# Altium PCB EVSE_Monitor.PcbDoc (part 2 of 2)
Units mm, origin at the board's own origin, x right, y up, seen from the top; angles counter-clockwise.
Board outline 130 x 100 mm, 2 copper layers (Top Layer, Bottom Layer), stack 1.581 mm thick; 132 components, 83 nets, 447 pads, 252 vias.
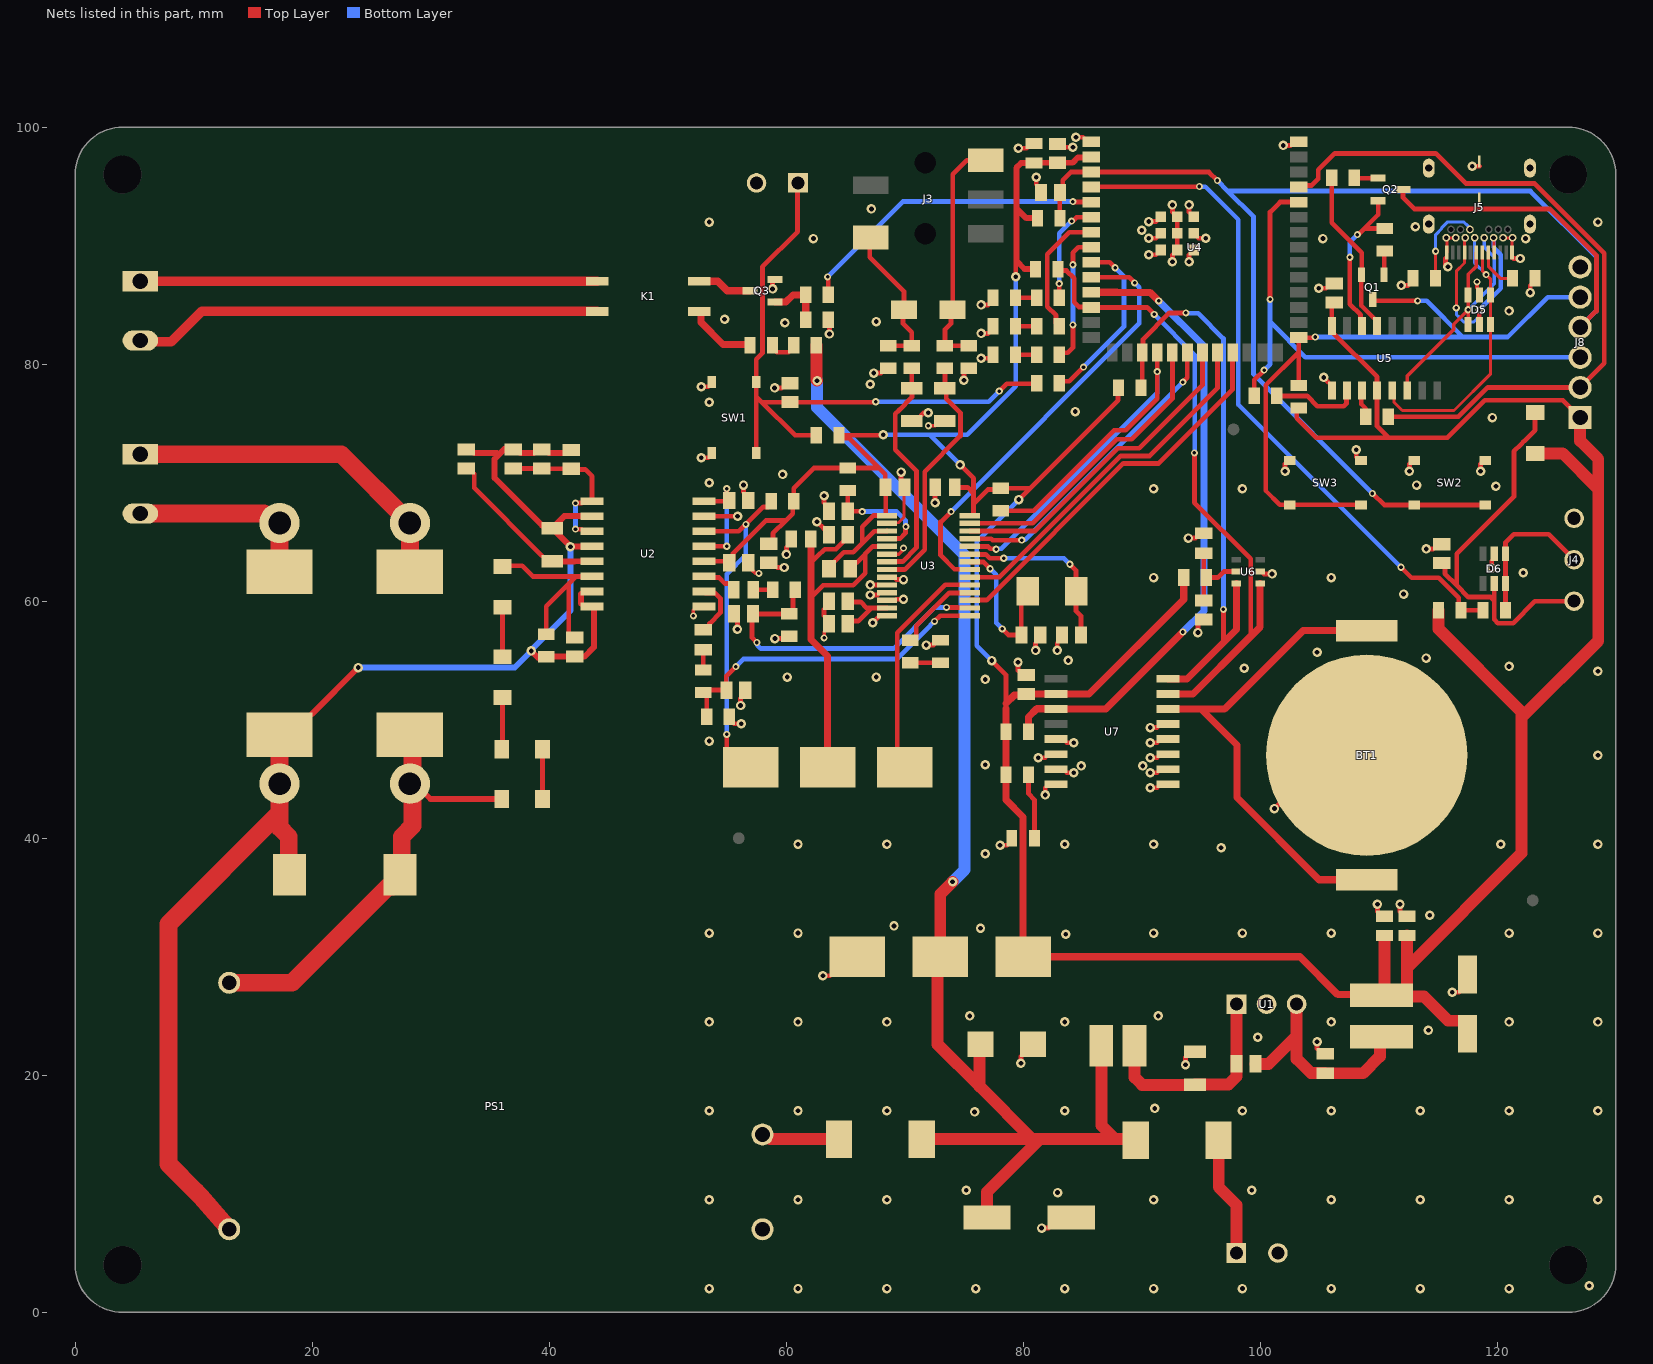
[diagram p2: the nets of this part, all layers, seen from the top]

## Via types
v1: diameter 0.8, hole 0.4, Top Layer to Bottom Layer, tented both sides, 193 vias
v2: diameter 0.6, hole 0.3, Top Layer to Bottom Layer, tented both sides, 59 vias

## Nets (pads, with @x,y where several pads share a name; then routed paths per layer and width w, separated by ;. In a path a pad name is that pad's centre, name@x,y a point inside that pad or via, vN(x,y) a via of type N, cw(c..) or ccw(c..) an arc to the next point about the centre after c; other vN are vias at no path point)
+3V3: C3.1 C4.1 C5.1 C14.1 C15.1 C24.1 C25.1 C33.2 C34.2 C35.2 C39.2 FB1.1 J8.1 L2.2 R1.1 R7.1 R16.1 R18.1 R21.2 R22.2 R27.2 R32.2 R33.2 R34.1 R35.2 R37.1 R38.1 TP3.1 U2.12 U3.1 U3.3 U3.28 U4.2 U5.4 U5.16 U7.2 | length 341.6
  Top Layer w0.4: U2.12@53.075,63.365 C14.1@55.085,63.365 ; C14.1@55.2,63.25 55.51,63.56 55.51,64.02 58.292,66.802 59.964,66.802 ; C15.1@58.547,64.846 58.573,64.846 58.883,65.156 58.883,65.722 59.964,66.802 ; FB1.1@63.728,63 64.853,64.125 65.649,64.125 66.421,64.897 ; v1(68.199,74.041) 68.158,74 R27.2@64.45,74 64.676,73.774 65.291,73.774 67.815,71.25 ; U3.3@68.502,65.925 68.477,65.9 67.424,65.9 66.421,64.897 ; U3.1@68.502,67.225 U3.1@68.425,67.225 ; C24.1@74.23,69.6 75.307,69.6 75.819,69.088 ; v1(74.676,71.501) 75.819,70.358 75.819,69.088 ; U3.28@75.498,67.225 75.794,67.225 75.819,67.25 75.819,68.207 ; v1(77.343,54.991) 78.55,53.784 78.55,51.372 78.55,50.927 ; v1(79.375,87.376) 79.375,89.869 79.422,89.916 ; v1(79.629,68.58) 80.579,69.53 ; R33.2@88.05,78 88.011,77.961 88.011,76.962 80.579,69.53 ; R21.2@103.25,76.3 103.077,76.127 103.077,75.459 104.749,73.787 110.842,73.787 ; U5.16@106.045,83.578 106.045,84.995 C35.2@106.25,85.2 ; U5.16@106.055,83.212 106.18,83.087 106.18,82.62 109.865,78.935 U5.4@109.865,77.788 109.865,74.764 110.842,73.787 ; J8.1@127,75.5 125.55,76.95 118.967,76.95 115.804,73.787 110.842,73.787 ; 59.964,66.802 60.549,67.387 60.549,68.362 R7.1@60.64,68.453 60.64,69.53 62.357,71.247 62.992,71.247 62.995,71.25 R16.1@65.2,71.25 67.815,71.25 ; 66.421,64.897 66.421,66.294 67.352,67.225 U3.1@68.425,67.225 ; 67.815,71.25 68.364,70.701 68.364,69.636 C25.1@68.4,69.6 68.4,67.25 U3.1@68.425,67.225 ; 75.819,68.207 75.819,69.088 ; 75.819,68.207 77.039,69.428 78.003,69.428 R18.1@78.105,69.53 80.579,69.53
  Top Layer w0.5: C33.2@80.9,96.98 80.884,96.964 79.819,96.964 79.422,96.567 79.422,93.171 ; C33.2@80.92,97 C34.2@82.9,97 84.173,97 84.634,97.461 85.721,97.461 U4.2@85.75,97.49 ; R32.2@81.05,88 81.02,88.03 80.118,88.03 79.422,88.726 79.422,89.916 79.422,93.171 ; R22.2@81.219,92.329 80.264,92.329 79.422,93.171
  Top Layer w0.6: 78.55,50.927 R34.1@78.55,49 78.552,48.998 R1.1@78.552,45.339 78.552,43.241 80,41.793 TP3.1@80,30 103.35,30 106.553,26.797 110.203,26.797 L2.2@110.352,26.648 ; 78.55,51.372 79.248,52.07 C39.2@80.391,52.07 ; C39.2@80.28,52.175 U7.2@82.775,52.175 ; U7.2@82.775,52.159 85.56,52.159 93.55,60.149 R38.1@93.55,62
  Top Layer w1: L2.2@110.25,26.75 110.498,26.998 C4.1@110.498,31.75 ; L2.2@110.352,26.648 113.814,26.648 115.862,24.6 117.2,24.6 117.5,24.3 C3.1@117.5,23.5 ; L2.2@112.4,27.3 112.4,29.088 ; C5.1@112.4,31.78 112.4,29.088 ; R35.2@115.05,59.25 115.05,57.67 122.047,50.673 122.047,50.165 ; R37.1@123.2,72.475 125.518,72.475 128.524,69.469 ; J8.1@127,75.5 127,73.533 128.524,72.009 128.524,69.469 ; 112.4,29.088 122.047,38.735 122.047,50.165 ; 122.047,50.165 128.524,56.642 128.524,69.469
  Bottom Layer w0.4: v1(68.199,74.041) 72.136,74.041 ; v1(74.676,71.501) 72.136,74.041 ; v1(77.343,54.991) 76.073,56.261 76.073,65.024 v1(79.629,68.58) ; v1(79.375,87.376) 79.375,78.131 75.285,74.041 72.136,74.041
+3V3A: C8.1 C28.1 FB1.2 TP4.1 U3.5 | length 35.4
  Top Layer w0.4: 62.103,60.325 63.119,61.341 65.659,61.341 66.675,62.357 66.675,63.881 ; 62.127,62.8 62.127,63.27 62.641,63.784 63.246,64.389 64.2,64.389 64.876,65.065 64.89,65.065 65.2,65.375 C28.1@65.2,65.6 ; FB1.2@65.416,62.738 65.416,62.888 65.791,63.263 65.941,63.263 67.303,64.625 U3.5@68.502,64.625 U3.5@68.477,64.6
  Top Layer w0.6: C8.1@62.08,65.25 62.103,65.227 62.103,63.27 62.103,62.776 62.103,60.325 62.103,56.769 63.5,55.372 TP4.1@63.5,46
+VIN: C2.1 D1.1 D2.1 D3.1 L1.1 R41.2 TP2.1 | length 115
  Top Layer w1: R41.2@62.55,81.6 62.55,78.674 v1(62.611,78.613) ; D1.1@71.445,14.605 80.772,14.605 ; v1(74.041,36.322) 73,35.281 TP2.1@73,30 72.771,29.771 72.771,22.606 76.327,19.05 ; D3.1@76.413,22.606 76.327,22.52 76.327,19.05 ; C2.1@76.95,8 76.95,10.148 81.407,14.605 ; L1.1@86.6,22.5 86.6,15.762 87.63,14.732 ; D2.1@89.268,14.732 D2.1@89.395,14.605 ; D2.1@89.5,14.5 D2.1@89.395,14.605 ; 76.327,19.05 80.772,14.605 ; 80.772,14.605 81.407,14.605 ; 81.407,14.605 D2.1@89.395,14.605
  Bottom Layer w1: v1(62.611,78.613) 62.611,76.327 75.057,63.881 75.057,37.338 v1(74.041,36.322)
AC_L1: F1.1 F1B.1 J1.1 | length 29.3
  Top Layer w1.5: J1.1@5.5,72.4 22.45,72.4 F1B.1@28.25,66.6 F1.1@28.25,62.475
AC_L1_F: F1.2 F1B.2 PS1.4 R2.1 RV1.1 | length 38.6
  Top Layer w0.5: F1B.2@28.7,44.6 29.993,43.307 R2.1@35.994,43.307
  Top Layer w1.5: PS1.4@13,27.8 18.3,27.8 26.4,35.9 26.75,35.9 27.4,36.55 RV1.1@27.4,36.9 27.559,37.059 27.559,40.132 28.475,41.048 28.475,48.5 F1.2@28.25,48.725
AC_L2: F2.1 F2B.1 J1.2 | length 16.2
  Top Layer w1.5: J1.2@5.5,67.4 15.936,67.4 16.736,66.6 F2B.1@17.25,66.6 F2.1@17.25,62.475
AC_L2_F: C9.2 C10.2 C11.2 C12.2 C16.2 C17.2 F2.2 F2B.2 PS1.1 R6.2 RV1.2 U2.2 U2.4 U2.7 U2.8 | length 113.9
  Top Layer w0.5: F2.2@20,50.5 v1(23.9,54.4) ; C17.2@33.7,72.5 35.6,72.5 ; C11.2@36.3,72.9 35.4,72 35.4,70.4 C16.2@39.4,66.4 ; C11.2@37.6,72.5 C10.2@38.7,72.5 ; v1(38.5,55.8) R6.2@39.1,55.2 ; C10.2@40,72.5 C12.2@41.2,72.5 ; R6.2@40.155,55.334 C9.2@42.164,55.334 C9.2@42.291,55.334 ; U2.8@42.7,59.8 U2.7@42.7,60.6 ; C9.2@42.776,55.372 42.253,55.372 C9.2@42.291,55.334 ; U2.8@43.625,59.555 U2.8@43.7,59.48 ; U2.4@43.625,64.635 41.784,64.635 C16.2@40.259,66.16 41.274,67.175 U2.2@43.625,67.175 ; U2.8@43.776,59.48 43.776,56.113 42.997,55.334 C9.2@42.291,55.334
  Top Layer w1.5: PS1.1@13,7 cw(c14.128,7.989) 12.999,7.002 10.592,9.754 ccw(c4,4) 10.187,10.187 7.874,12.5 7.874,12.728 7.874,32.766 17.25,42.142 ; F2.2@17.25,48.725 F2B.2@17.25,44.6 17.25,42.142 ; RV1.2@18.1,36.9 18.034,36.966 18.034,40.132 17.25,40.916 17.25,42.142
  Bottom Layer w0.5: v1(23.9,54.4) 37.1,54.4 v1(38.5,55.8) ; v1@38.7,56.1 41.8,59.2 v1(41.8,64.6)
AHT_VDD: C37.2 C38.2 R38.2 U6.2 | length 6.6
  Top Layer w0.4: C38.2@95.25,60.05 R38.2@95.25,62 ; R38.2@95.25,62.152 C37.2@95.25,64.067 ; R38.2@95.45,62 96.417,62 96.917,62.5 U6.2@98,62.5
AMC_DIAG: R7.2 TP5.1 U2.14 | length 29.1
  Top Layer w0.4: U2.14@53.075,65.905 53.086,65.894 54.413,65.894 56.005,65.894 58.064,67.953 58.465,67.953 58.74,68.228 R7.2@58.74,68.453 ; v2(54.991,48.768) 54.991,47.515 56.506,46 TP5.1@57,46
  Bottom Layer w0.4: v2(54.991,48.768) 54.991,62.291 56.6,63.9 v2(56.6,66.489)
AMC_LDO: C13.1 U2.13 U2.16 | length 10
  Top Layer w0.4: U2.13@53.075,64.635 v2(54.99,64.635) ; U2.16@53.075,68.445 55.145,68.445 C13.1@55.2,68.5 ; C13.1@54.99,68.445 v2(54.99,69.5)
  Bottom Layer w0.4: v2(54.99,64.635) v2(54.99,69.5)
AMC_OUTN: C21.1 U2.10 | length 5
  Top Layer w0.4: C21.1@53,57.58 53.25,57.58 53.535,57.865 53.535,58.115 54.45,59.03 54.45,60.231 53.981,60.7 53.2,60.7 U2.10@53.075,60.825
AMC_OUTP: C18.1 U2.11 | length 2.9
  Top Layer w0.4: U2.11@53.075,62.095 53.168,62.002 54.33,62.002 54.837,61.495 55.273,61.495 55.436,61.332 C18.1@55.436,61.125
ATM_CF1: R17.1 U3.18 | length 7.2
  Top Layer w0.4: R17.1@70.485,56.703 70.71,56.703 70.985,56.978 70.985,57.917 73.768,60.7 75.473,60.7 U3.18@75.498,60.725
ATM_CF2: TP6.1 U3.19 | length 19.4
  Top Layer w0.4: TP6.1@70,46 69.385,46.615 69.385,57.344 73.441,61.4 75.473,61.4 U3.19@75.498,61.375
ATM_IN: C23.1 R15.2 U3.8 | length 21
  Top Layer w0.4: U3.8@68.502,62.675 70.001,62.675 71.685,64.359 71.685,70.923 74.71,73.948 74.71,75.901 74.543,76.067 73.511,77.099 73.511,77.879 C23.1@73.4,77.99 R15.2@73.4,79.65
ATM_IP: C20.1 R8.2 U3.7 | length 19.4
  Top Layer w0.4: U3.7@68.502,63.325 68.527,63.35 69.827,63.35 70.993,64.516 70.993,70.993 69.215,72.771 69.215,75.826 69.524,76.135 69.531,76.135 70.612,77.216 70.612,77.978 C20.1@70.6,77.99 R8.2@70.6,79.65
ATM_RST: C29.1 R16.2 U3.4 | length 9.8
  Top Layer w0.4: R16.2@65.2,69.35 C29.1@65.2,67.6 66.385,67.6 v2(66.421,67.564) ; U3.4@68.502,65.275 68.52,65.293 69.611,65.293 70.066,65.748 70.066,66.256 v2(70.104,66.294)
  Bottom Layer w0.4: v2(66.421,67.564) 69.342,67.564 70.066,66.84 70.066,66.332 v2(70.104,66.294)
ATM_VN: C22.1 R12.2 R14.1 U3.15 | length 28.1
  Top Layer w0.4: R14.1@53.3,50.25 53.3,52.025 53.025,52.3 R12.2@53,52.3 53.2,52.5 C22.1@54.95,52.5 54.95,53.68 v2(55.753,54.483) ; v2(72.517,58.293) 72.999,58.775 U3.15@75.498,58.775
  Bottom Layer w0.4: v2(55.753,54.483) 56.388,55.118 69.342,55.118 72.163,57.939 72.163,57.959 72.497,58.293 v2(72.517,58.293)
ATM_VP: C19.1 R9.2 R10.1 U3.16 | length 27.7
  Top Layer w0.4: C19.1@57.188,58.928 C19.1@57.596,58.928 ; v2(57.531,56.515) 57.122,56.924 57.122,58.454 C19.1@57.596,58.928 ; R10.1@60.228,58.928 59.436,58.928 C19.1@57.596,58.928 ; R10.1@60.381,58.95 60.579,59.148 60.579,60.772 R9.2@60.767,60.96 ; v2(73.533,59.475) 74.455,59.475 74.48,59.45 75.473,59.45 U3.16@75.498,59.425
  Bottom Layer w0.4: v2(57.531,56.515) 57.569,56.477 57.569,56.303 57.865,56.007 69.088,56.007 72.556,59.475 v2(73.533,59.475)
ATM_VREF: C30.1 C31.1 U3.13 | length 6.1
  Top Layer w0.4: C31.1@65.2,58.1 65.429,58.329 66.076,58.329 67.172,59.425 ; C30.1@65.2,60 65.256,59.944 66.294,59.944 66.813,59.425 67.172,59.425 ; U3.13@68.502,59.425 67.172,59.425
BTN_PARAR: R31.2 U4.9 | length 14.9
  Top Layer w0.4: R31.2@83.05,78.4 83.207,78.557 83.891,78.557 v2(85.09,79.756) ; U4.9@85.75,88.6 87.295,88.6 v2(87.757,88.138)
  Bottom Layer w0.4: v2(85.09,79.756) 88.519,83.185 88.519,87.376 v2(87.757,88.138)
CC1: J5.A5 R23.2 | length 3.6
  Top Layer w0.25: J5.A5@119.25,89.42 119.253,89.417 119.253,88.265 120.268,87.25 R23.2@121.3,87.25
CC2: J5.B5 R24.2 | length 7.4
  Top Layer w0.25: R24.2@114.808,87.254 v2(114.808,89.535)
  Bottom Layer w0.25: v2(114.808,89.535) 114.808,90.931 115.319,91.443 115.319,91.509 115.831,92.02 117.169,92.02 117.55,91.639 117.55,91.628 117.7,91.478 J5.B5@117.7,91.37
CH_RXD: R25.2 U5.3 | length 2.4
  Top Layer w0.381: U5.3@108.595,77.788 108.55,77.743 108.55,76.616 108.905,76.261 R25.2@108.905,75.565
CH_TXD: R26.1 U5.2 | length 7.5
  Top Layer w0.4: R26.1@101.407,77.325 103.966,77.325 104.837,76.454 107.054,76.454 107.289,76.688 107.289,77.752 U5.2@107.325,77.788
CT_N: D4.1 J3.1 R13.1 R15.1 | length 20
  Top Layer w0.4: R13.1@75.4,81.55 R15.1@73.4,81.55 73.4,82.925 73.914,83.439 73.914,84.464 D4.1@74.05,84.6 74.05,96.021 75.229,97.2 J3.1@76.85,97.2
CT_P: D4.2 J3.2 R8.1 R11.2 | length 12.7
  Top Layer w0.4: J3.2@67.15,90.7 67.056,90.606 67.056,89.027 69.95,86.133 D4.2@69.95,84.6 69.85,84.5 69.85,83.439 70.6,82.689 R8.1@70.6,81.55 R11.2@68.6,81.55
DTR_N: Q1.2 R19.1 U5.13 | length 14.2
  Top Layer w0.381: R19.1@106.05,95.75 106.05,91.943 108.585,89.408 108.585,87.59 Q1.2@108.545,87.55 108.545,84.928 109.689,83.784 109.73,83.784 109.865,83.649 U5.13@109.865,83.212
ESP_EN: C32.2 J8.4 Q2.3 R22.1 SW2.C1 SW2.D1 U4.3 | length 124.3
  Top Layer w0.4: R22.1@82.992,92.329 83.096,92.433 C32.2@83.096,94.488 83.343,94.735 83.343,95.535 84.028,96.22 U4.3@85.75,96.22 95.677,96.22 v2(96.393,95.504) ; v2(109.474,69.088) 109.507,69.088 110.47,68.125 SW2.C1@113,68.125 SW2.D1@119,68.125 ; Q2.3@112.05,94.75 112.05,94.071 113.03,93.091 124.46,93.091 128.375,89.176 128.375,84.495 J8.4@127,83.12
  Bottom Layer w0.4: v2(96.393,95.504) 97.282,94.615 ; v2@109.474,69.114 99.441,79.147 99.441,92.456 97.282,94.615 ; J8.4@127,83.12 128.375,84.495 128.375,89.049 122.809,94.615 97.282,94.615
ESP_IO0: J8.5 Q1.3 R21.1 SW3.C1 SW3.D1 U4.27 | length 59.5
  Top Layer w0.381: R21.1@103.25,78.2 103.25,81.013 ; v2(104.648,82.296) 104.589,82.296 104.543,82.25 U4.27@103.25,82.25 103.25,81.013 ; SW3.D1@108.5,68.125 SW3.C1@102.5,68.125 102.478,68.147 101.652,68.147 100.457,69.342 100.457,78.22 103.25,81.013 ; Q1.3@109.5,85.45 109.606,85.344 v2(113.284,85.344)
  Bottom Layer w0.381: v2(104.648,82.296) 117.094,82.296 ; v2(113.284,85.344) 114.046,85.344 117.094,82.296 ; J8.5@127,85.66 124.268,85.66 120.904,82.296 117.094,82.296
EVSE_EN_A: J2.2 K1.4 | length 39.6
  Top Layer w0.8: J2.2@5.5,82 5.585,81.915 8.128,81.915 10.673,84.46 K1.4@44.05,84.46
EVSE_EN_B: J2.1 K1.3 | length 38.6
  Top Layer w0.8: J2.1@5.5,87 K1.3@44.05,87
GND: BT1.3 C2.2 C3.2 C4.2 C5.2 C6.2 C7.2 C8.2 C13.2 C14.2 C15.2 C19.2 C20.2 C22.2 C23.2 C24.2 C25.2 C26.2 C27.2 C28.2 C29.2 C30.2 C31.2 C32.1 C33.1 C34.1 C35.1 C36.1 C37.1 C38.1 C39.1 C40.1 D3.2 D5.2 D6.2 J4.3 J5.A1 J5.A12 J5.B1 J5.B12 J5.Shell J6.2 J7.2 J8.6 LED1.1 LED2.1 LED3.1 LED4.1 LED5.1 PS1.2 Q3.2 R10.2 R11.1 R13.2 R14.2 R23.1 R24.1 R40.1 SW1.A1 SW1.B1 SW2.A1 SW2.B1 SW3.A1 SW3.B1 TP1.1 U1.2 U2.9 U2.15 U3.2 U3.6 U3.9 U3.10 U3.11 U3.12 U3.14 U4.1 U4.40 U4.41 U4.42 U4.43 U4.44 U4.45 U4.46 U4.47 U4.48 U4.49 U5.1 U6.5 U7.5 U7.6 U7.7 U7.8 U7.9 U7.10 U7.11 U7.12 U7.13 | length 64.5
  Top Layer w0.25: U3.2@69,66.62 69.49,66.62 69.95,67.08 C25.2@69.95,69 ; J5.B1@115.7,90.67 J5.Shell@116.5,90.67 ; J5.A12@115.75,89.42 J5.B1@115.75,90.4 ; J5.Shell@120.5,90.67 J5.B12@121.3,90.67 ; J5.A1@121.25,89.42 J5.B12@121.25,90.4
  Top Layer w0.3: v2(52.175,58.755) U2.9@52.175,59.255 ; C14.2@57.2,62.55 57.4,62.35 v2(57.7,62.35) ; v2(63.2,56.9) C31.2@63.2,57.4 ; U3.6@69.302,63.975 69.502,63.975 69.902,64.375 v2(69.902,64.475) ; v2(72,74.81) C23.2@72.6,74.81 ; D5.2@118.3,86.45 v2(118.3,86.95)
  Top Layer w0.4: v1(52.825,72.1) SW1.A1@53.425,72.1 ; v1(52.825,78.1) SW1.B1@53.425,78.1 ; U2.15@53.075,67.175 v1(55.9,67.175) ; R14.2@55.6,49.65 v1(56.2,49.65) ; v1(55.888,57.628) C19.2@55.888,58.228 ; v1(56.15,51.2) C22.2@56.15,51.8 ; C13.2@56.4,69.2 v1(56.4,69.8) ; v1(58.85,86.355) Q3.2@58.85,86.955 ; v1(59.025,77.997) C36.1@59.625,77.997 ; v1(59.05,56.85) R10.2@59.65,56.85 ; C15.2@59.247,62.846 v1(59.847,62.846) ; v1(60.02,63.95) C8.2@60.02,64.55 ; v1(62.6,66.7) C28.2@63.2,66.1 ; v1(63.1,28.4) TP1.1@63.7,28.4 ; C31.2@63.2,58.8 C30.2@63.2,59.3 ; C29.2@63.2,68.3 v1(63.2,68.9) ; v1(63.65,82.55) R40.1@63.65,83.15 ; v1(67.102,60.525) U3.11@67.702,60.525 ; v1(67.102,61.375) U3.10@67.702,61.375 ; v1(67.302,58.175) U3.14@67.702,58.575 ; v1(67.4,79.25) R11.1@68,79.25 ; U3.12@69.302,60.175 v1(69.902,60.175) ; U3.9@69.302,61.825 v1(69.902,61.825) ; C25.2@69.7,70.3 v1(69.7,70.9) ; C20.2@71.4,75.71 71.6,75.91 v1(72,75.91) ; v1(71.825,56.303) LED2.1@72.425,56.303 ; v1(72.57,68.3) C24.2@72.57,68.9 ; v1(75,78.65) R13.2@75,79.25 ; v1(76.45,80.5) LED5.1@77.05,80.5 ; v1(76.45,82.6) LED4.1@77.05,82.6 ; v1(76.45,85) LED3.1@77.05,85 ; v1(78.05,39.4) LED1.1@78.65,39.4 ; C39.1@79.564,54.159 v1(79.564,54.859) ; v1(79.6,98.22) C33.1@80.3,98.22 ; v1(79.813,21.006) D3.2@79.813,21.606 ; v1(81.045,55.85) C26.2@81.045,56.45 ; C32.1@81.096,95.188 v1(81.096,95.788) ; v1(81.275,46.795) U7.6@81.875,46.795 ; v1(81.55,7.1) C2.2@82.15,7.1 ; v1(81.875,43.655) U7.8@81.875,44.255 ; v1(82.874,55.85) C27.2@82.874,56.45 ; C34.1@83.6,98.3 v1(84.2,98.3) ; U7.7@83.675,45.525 v1(84.275,45.525) ; U7.5@83.675,48.065 v1(84.275,48.065) ; v1(84.45,99.16) U4.1@85.05,99.16 ; v1(90.6,89.24) U4.44@91.2,89.24 ; v1(90.6,90.64) U4.43@91.2,90.64 ; v1(90.6,92.04) U4.42@91.2,92.04 ; v1(90.725,44.255) U7.9@91.325,44.255 ; v1(90.725,45.525) U7.10@91.325,45.525 ; v1(90.725,46.795) U7.11@91.325,46.795 ; v1(90.725,48.065) U7.12@91.325,48.065 ; v1(90.725,49.335) U7.13@91.325,49.335 ; v1(92.6,88.64) U4.45@92.6,89.24 ; U4.49@92.6,92.84 v1(92.6,93.44) ; U4.45@93,89.64 U4.41@93,91.04 U4.49@93,92.44 ; v1(93.7,20.89) C6.2@93.7,21.49 ; v1(93.95,65.327) C37.1@94.55,65.327 ; v1(94,88.64) U4.46@94,89.24 ; U4.48@94,92.84 v1(94,93.44) ; v1(94.75,57.35) C38.1@94.75,58.05 ; U4.47@94.8,90.64 v1(95.4,90.64) ; U6.5@100.3,62.3 v1(101,62.3) ; v1(101.2,42.5) BT1.3@101.6,42.9 ; v1(101.95,98.46) U4.40@102.55,98.46 ; v1(102.1,70.975) SW3.A1@102.1,71.575 ; C7.2@104.8,22.23 v1(104.8,22.83) ; v1(104.95,86.4) C35.1@105.55,86.4 ; v1(105.355,78.888) U5.1@105.755,78.488 ; SW3.B1@108.1,72.175 v1(108.1,72.775) ; C4.2@109.9,33.82 v1(109.9,34.42) ; C5.2@111.8,33.82 v1(111.8,34.42) ; v1(111.903,86.649) R24.1@112.503,86.649 ; v1(112.6,70.975) SW2.A1@112.6,71.575 ; v1(114.016,64.408) C40.1@114.616,64.408 ; J5.A12@115.65,88.92 115.65,88.42 v1(115.85,88.22) ; v1(116.2,27) C3.2@116.8,27 ; v1(117.9,96.7) J5.Shell@118.5,96.7 ; v1(118.6,70.975) SW2.B1@118.6,71.575 ; v1(119.55,62.8) D6.2@119.55,63.4 ; J5.A1@121.35,88.92 v1(121.95,88.92) ; v1(122.8,86.05) R23.1@122.8,86.65
  other v1: 53.5,2 61,2 68.5,2 76,2 83.5,2 91,2 98.5,2 106,2 113.5,2 121,2 127.768,2.232 53.5,9.5 61,9.5 68.5,9.5 91,9.5 106,9.5 113.5,9.5 121,9.5 128.5,9.5 82.9,10.1 75.2,10.3 99.3,10.3 75.9,16.9 53.5,17 61,17 68.5,17 83.5,17 98.5,17 106,17 113.5,17 121,17 128.5,17 91.1,17.2 99.8,23.2 114.2,23.8 53.5,24.5 61,24.5 68.5,24.5 83.5,24.5 106,24.5 121,24.5 128.5,24.5 75.5,25 91.4,25 83.6,31.9 53.5,32 61,32 91,32 98.5,32 106,32 121,32 128.5,32 76.4,32.4 69.1,32.6 114.3,33.5 76.8,38.7 96.702,39.185 61,39.5 68.5,39.5 83.5,39.5 91,39.5 120.3,39.5 128.5,39.5 84.9,46.1 90.1,46.1 76.8,46.2 128.5,47 53.5,48.2 76.8,53.4 60.1,53.6 67.6,53.6 128.5,54.1 98.66,54.34 121,54.5 83.8,55 114,55.2 104.8,55.7 112.1,60.6 91,62 106,62 122.2,62.4 91,69.5 98.5,69.5 119.9,69.7 113.2,69.8 53.5,70 59.7,70.7 119.6,75.5 84.4,76 53.5,76.8 67.1,78.3 59.9,83.5 67.6,83.6 54.8,83.8 121,84.5 62.3,90.6 105.3,90.6 122.4,90.6 90,91.3 113.1,91.6 53.5,92 128.5,92 67.2,93.1
HV_D1: R2.2 R3.1 | length 4.2
  Top Layer w0.4: R2.2@39.444,43.307 R3.1@39.444,47.498
HV_D2: R3.2 R4.1 | length 4.5
  Top Layer w0.4: R3.2@35.994,47.498 36.068,47.572 R4.1@36.068,51.869
  Top Layer w1: R4.1@35.994,51.795 R4.1@36.068,51.869
HV_D3: R4.2 R5.1 | length 4.2
  Top Layer w0.4: R4.2@36.068,55.319 R5.1@36.068,59.489
HV_DCDC: C10.1 C11.1 C12.1 U2.1 U2.3 | length 12.2
  Top Layer w0.4: C11.1@36.957,71.209 C10.1@39.37,71.209 39.404,71.175 C12.1@41.857,71.175 41.912,71.12 43.053,71.12 43.625,70.548 U2.1@43.625,68.445 ; v2(42.222,66.08) U2.3@42.722,66.08 ; v2(42.222,68.28) U2.1@42.722,68.28
  Bottom Layer w0.4: v2(42.222,66.08) v2(42.222,68.28)
HV_INP: C9.1 R5.2 R6.1 U2.6 | length 19.5
  Top Layer w0.4: R5.2@36.068,62.939 36.121,62.992 37.719,62.992 38.616,62.095 42.283,62.095 ; R6.1@40.026,56.936 R6.1@39.751,57.211 39.751,59.563 41.656,61.468 ; C9.1@41.91,57.188 C9.1@42.164,56.934 41.966,56.934 41.656,57.244 41.656,61.468 ; U2.6@43.625,62.095 42.283,62.095 ; 41.656,61.468 41.969,61.781 42.283,62.095
HV_LDO: C16.1 C17.1 U2.5 | length 12.6
  Top Layer w0.4: C17.1@33.685,70.755 33.685,69.555 C16.1@39.385,63.855
  Top Layer w0.5: C16.1@40.259,63.365 42.156,63.365 42.164,63.373 43.617,63.373 U2.5@43.625,63.365
I2C_SCL: R33.1 U4.17 U6.3 U7.16 | length 50.4
  Top Layer w0.4: R33.1@89.95,78 90.055,78.105 U4.17@90.055,81 90.117,81.062 90.117,82.116 92.329,84.328 v2(93.726,84.328) ; 96.52,56.134 96.901,56.515 v2(96.901,59.309)
  Top Layer w0.6: U7.16@92.225,53.445 93.831,53.445 96.52,56.134 98,57.614 U6.3@98,61.5
  Bottom Layer w0.4: v2(93.726,84.328) 93.764,84.29 94.78,84.29 96.901,82.169 v2(96.901,59.309)
I2C_SDA: R32.1 U4.12 U6.4 U7.15 | length 55.7
  Top Layer w0.4: R32.1@82.95,88 83.05,87.9 83.657,87.9 84.306,87.252 84.306,85.239 84.709,84.836 85.704,84.836 U4.12@85.75,84.79 90.47,84.79 v2(91.059,84.201) ; v2(94.45,72.517) 94.45,68.313 99.2,63.563 99.2,57.036 98.87,56.706
  Top Layer w0.6: U7.15@92.225,52.175 94.339,52.175 98.87,56.706 100,57.836 U6.4@100,61.5
  Bottom Layer w0.4: v2(91.059,84.201) 94.488,80.772 94.488,72.555 v2(94.45,72.517)
J4_3V3: C40.2 D6.5 J4.1 R37.2 | length 34.2
  Top Layer w0.4: C40.2@115.316,63.208 115.52,63.208 115.595,63.133 115.595,62.332 116.586,61.341 ; D6.5@119.75,61.5 119.75,60.041 ; R37.2@123.2,75.925 123.2,74.432 122.268,73.5 122.259,73.5 122.025,73.266 122.025,73.257 121.412,72.644 121.412,68.834 116.586,64.008 116.586,61.341 ; J4.1@126.5,60 123.191,60 121.341,58.15 120.059,58.15 119.75,58.459 119.75,60.041 ; 116.586,61.341 117.577,60.35 119.441,60.35 119.75,60.041
LED_CARGA: R29.2 U4.7 | length 11
  Top Layer w0.4: R29.2@83.05,83.2 82.775,83.475 82.775,84.134 82.042,84.867 82.042,89.281 83.901,91.14 U4.7@85.75,91.14
LED_FALLA: R30.2 U4.8 | length 11.1
  Top Layer w0.4: R30.2@83.05,80.8 83.213,80.963 83.757,80.963 84.201,81.407 v2(84.201,83.312) ; v2(84.201,88.392) 84.201,89.408 84.663,89.87 U4.8@85.75,89.87
  Bottom Layer w0.4: v2(84.201,83.312) v2(84.201,88.392)
LED_WIFI: R28.2 U4.6 | length 8.7
  Top Layer w0.4: R28.2@83.05,85.6 v2(83.05,86.8) ; v2(84.094,92.075) 84.168,92.075 84.503,92.41 U4.6@85.75,92.41
  Bottom Layer w0.4: v2(83.05,86.8) 83.05,91.051 84.074,92.075 v2(84.094,92.075)
MEAS_CS: R18.2 U3.24 U4.18 | length 44.2
  Top Layer w0.4: U3.24@75.498,64.625 77.026,64.625 77.224,64.427 77.686,64.427 v2(77.724,64.389) ; R18.2@78.105,67.63 80.878,67.63 87.67,74.422 88.646,74.422 91.313,77.089 91.313,80.988 U4.18@91.325,81
  Bottom Layer w0.4: v2(77.724,64.389) 77.757,64.422 78.164,64.422 91.313,77.571 v2(91.313,79.375)
MEAS_IRQ: U3.20 U4.22 | length 30.5
  Top Layer w0.4: U3.20@75.498,62.025 78.001,62.025 88.239,72.263 90.678,72.263 96.394,77.979 96.394,80.989 U4.22@96.405,81
MEAS_MISO: U3.26 U4.21 | length 27.5
  Top Layer w0.4: U3.26@75.498,65.925 80.998,65.925 87.977,72.905 89.796,72.905 95.124,78.233 95.124,80.989 U4.21@95.135,81
MEAS_MOSI: U3.27 U4.19 | length 25.4
  Top Layer w0.4: U3.27@75.498,66.575 80.799,66.575 87.884,73.66 89.154,73.66 92.595,77.101 U4.19@92.595,81
MEAS_SCK: U3.25 U4.20 | length 26.2
  Top Layer w0.4: U3.25@75.498,65.275 77.292,65.275 77.416,65.151 v2(79.883,65.151) ; v2(93.472,78.486) 93.853,78.867 93.853,80.988 U4.20@93.865,81
  Bottom Layer w0.4: v2(79.883,65.151) 79.921,65.189 80.175,65.189 v2(93.472,78.486)
MEAS_WARN: U3.17 U4.23 | length 32.7
  Top Layer w0.4: U3.17@75.498,60.075 75.523,60.1 76.924,60.1 88.452,71.628 91.44,71.628 97.664,77.852 97.664,80.989 U4.23@97.675,81
MEAS_ZX: U3.21 U4.10 | length 36.9
  Top Layer w0.4: v2(73.914,67.564) 73.025,66.675 73.025,63.881 74.206,62.7 75.473,62.7 U3.21@75.498,62.675 ; U4.10@85.75,87.33 88.946,87.33 v2(89.408,86.868)
  Bottom Layer w0.4: v2(73.914,67.564) 89.789,83.439 89.789,86.487 v2(89.408,86.868)
NetC1_1: C1.1 C7.1 L2.1 U1.3 | length 18.9
  Top Layer w1: C1.1@99.606,20.955 100.711,20.955 103.08,23.324 ; U1.3@103.08,26 103.08,23.324 ; L2.1@110.25,23.25 110.109,23.109 110.109,21.59 108.689,20.17 C7.1@105.5,20.17 105.485,20.185 104.951,20.185 104.943,20.193 104.267,20.193 103.08,21.38 103.08,23.324
NetC1_2: C1.2 C6.1 L1.2 U1.1 | length 18.2
  Top Layer w1: L1.2@89.4,22.5 89.4,19.82 90.043,19.177 93.739,19.177 93.747,19.185 94.475,19.185 C6.1@94.5,19.21 97.315,19.21 97.996,19.891 97.996,20.945 C1.2@98.006,20.955 ; C1.2@98.006,20.73 U1.1@98.006,25.994
NetC18_2: C18.2 R9.1 | length 1.6
  Top Layer w0.4: C18.2@57.218,60.96 R9.1@58.867,60.96
NetC21_2: C21.2 R12.1 | length 1.7
  Top Layer w0.4: R12.1@53,54.2 C21.2@53,55.92
NetK1_1: K1.1 LED6.1 | length 6
  Top Layer w0.6: K1.1@52.65,84.46 52.732,84.46 52.807,84.385 52.807,83.536 54.682,81.661 56.889,81.661 LED6.1@56.95,81.6
NetLED1_2: LED1.2 R1.2 | length 5.5
  Top Layer w0.4: R1.2@80.452,45.339 80.452,43.754 80.95,43.256 LED1.2@80.95,40
NetLED2_2: LED2.2 R17.2 | length 2.5
  Top Layer w0.4: R17.2@70.485,54.803 LED2.2@73.025,54.803
NetLED3_2: LED3.2 R28.1 | length 1.8
  Top Layer w0.4: LED3.2@79.35,85.6 R28.1@81.15,85.6
NetLED4_2: LED4.2 R29.1 | length 1.8
  Top Layer w0.4: LED4.2@79.35,83.2 R29.1@81.15,83.2
NetLED5_2: LED5.2 R30.1 | length 1.8
  Top Layer w0.4: LED5.2@79.35,80.8 R30.1@81.15,80.8
NetLED6_2: LED6.2 R41.1 | length 1
  Top Layer w0.4: LED6.2@59.2,81 R41.1@60.2,81
NetQ1_1: Q1.1 R20.2 | length 2
  Top Layer w0.381: Q1.1@110.455,87.55 110.455,89.505 R20.2@110.5,89.55
NetQ2_1: Q2.1 R19.2 | length 2
  Top Layer w0.381: R19.2@107.95,95.75 107.995,95.705 Q2.1@109.95,95.705
NetQ3_1: Q3.1 R39.2 R40.2 | length 5
  Top Layer w0.6: Q3.1@59.05,85.245 59.972,85.245 60.579,85.852 61.648,85.852 R39.2@61.65,85.85 R40.2@61.65,83.75
OW_DATA: R35.1 R36.1 U4.4 | length 57.5
  Top Layer w0.381: U4.4@85.75,94.95 85.796,94.996 v2(94.869,94.996) ; v2(111.887,62.865) 112.776,61.976 115.062,61.976 116.758,60.28 116.758,59.442 R35.1@116.95,59.25 R36.1@118.8,59.25
  Bottom Layer w0.381: v2(94.869,94.996) 95.377,94.996 98.171,92.202 98.171,76.581 v2(111.887,62.865)
OW_J4: D6.1 D6.6 J4.2 R36.2 | length 12.7
  Top Layer w0.4: R36.2@120.7,59.25 D6.6@120.7,61.5 D6.1@120.7,64 120.713,64.013 120.713,64.96 121.412,65.659 124.341,65.659 J4.2@126.5,63.5
PARAR_IN: C36.2 J7.1 R27.1 R31.1 SW1.C1 SW1.D1 | length 54.5
  Top Layer w0.4: SW1.C1@57.475,72.5 57.475,77.272 ; J7.1@61,95.3 60.96,95.26 60.96,91.186 58,88.226 58,80.934 57.475,80.409 SW1.D1@57.475,78.5 57.475,77.272 ; R27.1@62.55,74 60.747,74 57.95,76.797 ; v2(67.564,76.835) 67.526,76.797 C36.2@60.325,76.797 57.95,76.797 ; v2(77.978,77.724) 78.613,78.359 R31.1@81.15,78.359 ; 57.475,77.272 57.95,76.797
  Bottom Layer w0.4: v2(67.564,76.835) 77.089,76.835 v2(77.978,77.724)
RELAY_DRV: K1.2 Q3.3 | length 4.6
  Top Layer w0.6: K1.2@52.65,87 54.224,87 55.024,86.2 Q3.3@56.95,86.2
RELAY_EN: R39.1 U4.5 | length 26.4
  Top Layer w0.4: v2(63.5,87.376) 63.5,87.322 63.55,87.272 R39.1@63.55,85.85 ; v2(84.201,93.726) 84.239,93.688 85.742,93.688 U4.5@85.75,93.68
  Bottom Layer w0.4: v2(63.5,87.376) 69.85,93.726 v2(84.201,93.726)
RTC_INT: R34.2 U4.11 U7.3 | length 53.5
  Top Layer w0.6: R34.2@80.45,49 80.462,49.012 80.462,50.236 81.153,50.927 82.753,50.927 U7.3@82.775,50.905 86.973,50.905 v2(93.472,57.404) ; U4.11@85.75,86.06 85.759,86.069 87.933,86.069 87.934,86.068 90.716,86.068 v2(91.44,85.344)
  Bottom Layer w0.6: v2(91.44,85.344) 95.25,81.534 95.25,59.182 v2(93.472,57.404)
RTC_VBAT: BT1.1 BT1.2 U7.14 | length 42.1
  Top Layer w0.6: U7.14@92.225,50.905 95.018,50.905 ; BT1.1@109,36.5 104.978,36.5 98.044,43.434 98.044,47.879 95.018,50.905 ; BT1.2@109,57.5 108.969,57.531 103.632,57.531 97.006,50.905 95.018,50.905
RTS_N: Q2.2 R20.1 U5.14 | length 13.7
  Top Layer w0.381: 108.776,91.45 109.95,92.624 Q2.2@109.95,93.795
  Top Layer w0.4: v2(107.569,89.027) 107.569,85.069 108.47,84.168 108.47,83.337 U5.14@108.595,83.212 ; v2(108.204,90.932) 108.258,90.932 108.776,91.45 R20.1@110.5,91.45
  Bottom Layer w0.4: v2(107.569,89.027) 107.569,90.297 v2(108.204,90.932)
UART_RX: J8.3 R26.2 U4.36 | length 46.2
  Top Layer w0.4: R26.2@99.507,77.343 99.507,78.679 v2(100.33,79.502) ; v2(100.838,85.471) 100.838,92.837 101.681,93.68 U4.36@103.25,93.68
  Bottom Layer w0.4: v2(100.33,79.502) 100.838,80.01 100.838,83.566 ; v2(100.838,85.471) 100.838,83.566 ; J8.3@127,80.58 103.824,80.58 100.965,83.439 100.838,83.566
UART_TX: J8.2 R25.1 U4.37 | length 60.3
  Top Layer w0.4: U4.37@103.25,94.95 103.389,95.089 104.36,95.089 104.902,95.631 104.902,96.393 106.299,97.79 114.808,97.79 117.348,95.25 123.15,95.25 129.032,89.368 129.032,80.072 J8.2@127,78.04 119.209,78.04 116.734,75.565 R25.1@110.805,75.565
USB_DN: D5.3 D5.4 J5.A7 J5.B7 U5.6 | length 22.6
  Top Layer w0.3: U5.6@112.405,77.788 112.405,79.004 116.332,82.931 116.332,83.382 v2(117.55,84.6) ; D5.4@117.55,83.35 v2(117.55,84.6) ; J5.A7@118.25,89.42 118.25,88.278 117.55,87.578 D5.3@117.55,85.85 v2(117.55,84.6)
  Bottom Layer w0.3: v2(117.55,84.6) 119.76,86.811 119.76,89.028 118.9,89.888 J5.B7@118.9,90.67
USB_DP: D5.1 D5.6 J5.A6 J5.B6 U5.5 | length 24.8
  Top Layer w0.254: U5.5@111.135,77.788 111.276,77.647 111.276,76.811 111.995,76.092 116.351,76.092 119.45,79.191 D5.6@119.45,83.35 D5.1@119.45,85.85 119.45,87.179 v2(119.062,87.566) 118.75,87.879 J5.A6@118.75,89.42
  Bottom Layer w0.254: J5.B6@118.1,90.67 118.1,88.529 v2(119.062,87.566)
VBUS: D5.5 J5.A4 J5.A9 J5.B4 J5.B9 | length 18.6
  Top Layer w0.25: v2(116.55,84.75) 116.55,87.85 117.25,88.55 J5.A9@117.25,89 ; J5.A4@119.75,89.42 J5.B9@119.75,90.4
  Top Layer w0.254: J5.A9@117.25,89.42 117.25,90.62 J5.B4@117.3,90.67
  Top Layer w0.381: v2(118.491,84.582) 118.5,84.573 D5.5@118.5,83.35
  Bottom Layer w0.25: v2(116.55,84.75) 116.55,84.2 116.75,84 117.2,83.55 118,83.55 118.491,84.041 v2(118.491,84.582)
  Bottom Layer w0.381: v2(118.491,84.582) 120.301,86.392 120.301,89.251 119.7,89.852 J5.B9@119.7,90.67
VIN_ACDC: D1.2 PS1.3 | length 6.6
  Top Layer w1: PS1.3@58,15 58.233,15 58.628,14.605 D1.2@64.445,14.605
VIN_BANCO: D2.2 J6.1 | length 10.1
  Top Layer w1: D2.2@96.5,14.5 96.5,10.561 98,9.061 J6.1@98,5
XTAL_I: C26.1 U3.22 Y1.2 | length 13.2
  Top Layer w0.4: U3.22@75.498,63.325 75.523,63.3 76.654,63.3 v2(77.216,62.738) ; v2(78.232,57.658) 78.74,57.15 C26.1@79.845,57.15 79.845,60.305 Y1.2@80.373,60.833
  Bottom Layer w0.4: v2(77.216,62.738) 77.724,62.23 77.724,58.166 v2(78.232,57.658)
XTAL_O: C27.1 U3.23 Y1.1 | length 15.2
  Top Layer w0.4: U3.23@75.498,63.975 75.523,63.95 76.853,63.95 77.176,63.627 v2(78.359,63.627) ; v2(83.947,63.119) 84.455,62.611 84.455,59.182 84.874,58.763 C27.1@84.874,57.15
  Bottom Layer w0.4: v2(78.359,63.627) 83.439,63.627 v2(83.947,63.119)
pads on no net: D6.3 D6.4 J3.3 J3.10 J3.11 J3.12 J3.13 J5.A2 J5.A3 J5.A8 J5.A10 J5.A11 J5.B2 J5.B3 J5.B8 J5.B10 J5.B11 U4.13 U4.14 U4.15 U4.16 U4.24 U4.25 U4.26 U4.28 U4.29 U4.30 U4.31 U4.32 U4.33 U4.34 U4.35 U4.38 U4.39 U5.7 U5.8 U5.9 U5.10 U5.11 U5.12 U5.15 U6.1 U6.6 U7.1 U7.4

## Polygon pours and split planes (outlines as drawn)
GND on Bottom Layer "Bottom Layer-GND" (solid, remove dead copper, pour order 2): 52,0.5 126,0.5 ccw(c126,4) 129.5,4 129.5,96 ccw(c126,96) 126,99.5 52,99.5
GND on Top Layer "Top Layer-GND" (solid, remove dead copper, pour order 1): 52,0.5 126,0.5 ccw(c126,4) 129.5,4 129.5,96 ccw(c126,96) 126,99.5 52,99.5

## Keep-outs
Top Layer:
  circle w0.981: c97.75,74.5 r1.491
  circle w1: c123,34.75 r1.5
  circle w1: c56,40 r1.5
Keep-Out Layer:
  rectangle: 0,74.6 45.4,80.6
  rectangle: 45.4,0 51.4,100

## Silkscreen, mask and mechanical layers (free items; w line width, h text height)
Top Overlay:
  circle w0.284: c38.852,34.638 r0.458
  rectangle: 35.416,33.002 39.889,33.711
  lines w0.18: 5.223,58.102 6.135,58.102 ; 5.252,58.246 6.215,58.246 ; 5.282,58.39 6.295,58.39 ; 5.311,58.534 6.375,58.534 ; 5.341,58.678 6.455,58.678 ; 5.371,58.822 5.864,58.822 ; 5.4,58.966 5.894,58.966 ; 5.43,59.11 5.924,59.11 ; 5.46,59.254 5.954,59.254 ; 5.489,59.398 5.984,59.398 ; 5.519,59.542 6.014,59.542 ; 5.549,59.686 6.044,59.686 ; 5.578,59.83 6.074,59.83 ; 5.65,57.238 5.655,57.238 ; 5.678,57.382 5.735,57.382 ; 5.707,57.526 5.815,57.526 ; 5.736,57.67 5.895,57.67 ; 5.765,57.814 5.975,57.814 ; 5.794,57.958 6.055,57.958 ; 5.128,58.08 5.728,58.08 5.455,56.716 6.546,58.68 5.924,58.68 6.186,59.935 5.51,59.935 5.128,58.08
  lines w0.19: 5.486,46.388 5.486,47.998 ; 5.861,46.432 5.861,48.311 ; 6.237,46.432 6.237,48.132 ; 6.604,46.522 6.604,47.729
  lines w0.2: 45.6,0.6 45.6,99.4 ; 51.2,0.6 51.2,99.4 ; 105.2,10.503 122.6,10.503 ; 104.6,4.503 123.2,4.503 123.2,16.603 104.6,16.603 104.6,4.503
  lines w0.24: 37.107,37.911 37.216,35.347 ; 38.089,35.347 38.198,37.911
  lines w0.262: 4.77,47.103 4.904,46.745 5.351,46.209 5.396,45.404 6.559,45.404 6.648,46.835
  lines w0.284: 37.052,38.838 37.161,39.329 38.143,39.329 38.252,38.838
  lines w0.327: 35.961,38.402 36.289,34.856 39.016,34.856 39.343,38.402
  lines w0.393: 35.416,34.202 39.889,39.602 ; 35.416,39.602 39.889,34.202 ; 35.634,38.674 39.671,38.674
  lines w0.415: 5.04,47.486 7.386,45.577
  lines w0.45: 2.757,44.602 5.968,50.162 9.178,44.602 2.757,44.602
  lines w0.55: 2.713,55.955 5.837,61.365 8.961,55.955 2.713,55.955
  text "HABILITACION EVSE (J2)" at 10.795,88.011 h1
  text "PELIGRO!! 240 VAC" at 10.668,73.66 h1
  text "EVSE IoT CONTROL" at 105.4,13.603 h2
  text "OCT-2026                                  PUJ" at 105.4,11.303 h1.2
  text "Nicolás Gómez Ramírez" at 105.4,7.803 h1.6
  text "Hardware en IoT" at 105.4,5.403 h1.2
  text "ZONA DE RED 120-240 VAC" at 18.034,0.889 h1
Bottom Overlay:
  drawing of 209 lines, arcs and shapes, not listed
  text "Para más información" at 36.983,36.7 h1.6
  text "Circuitos y diseños" at 35.73,9.95 h1.5
  text "nicolasgomez.dev" at 34.182,8.15 h1.2
  text "Made by: Nicopro3000..." at 69.523,0.848 h0.8
Mechanical 1:
  the board outline again, w0.1

## Text inside footprints (layer, text, board x,y; h text height)
J5: Assembly Notes "PCB Edge" at 120.2,100.95 h0.61 r180